# Altium PCB IDC_Tester_v1.PcbDoc (part 3 of 5)
Units mm, origin at the board's own origin, x right, y up, seen from the top; angles counter-clockwise.
Board outline 140 x 140 mm, 2 copper layers (Top Layer, Bottom Layer); 594 components, 528 nets, 1855 pads, 179 vias.
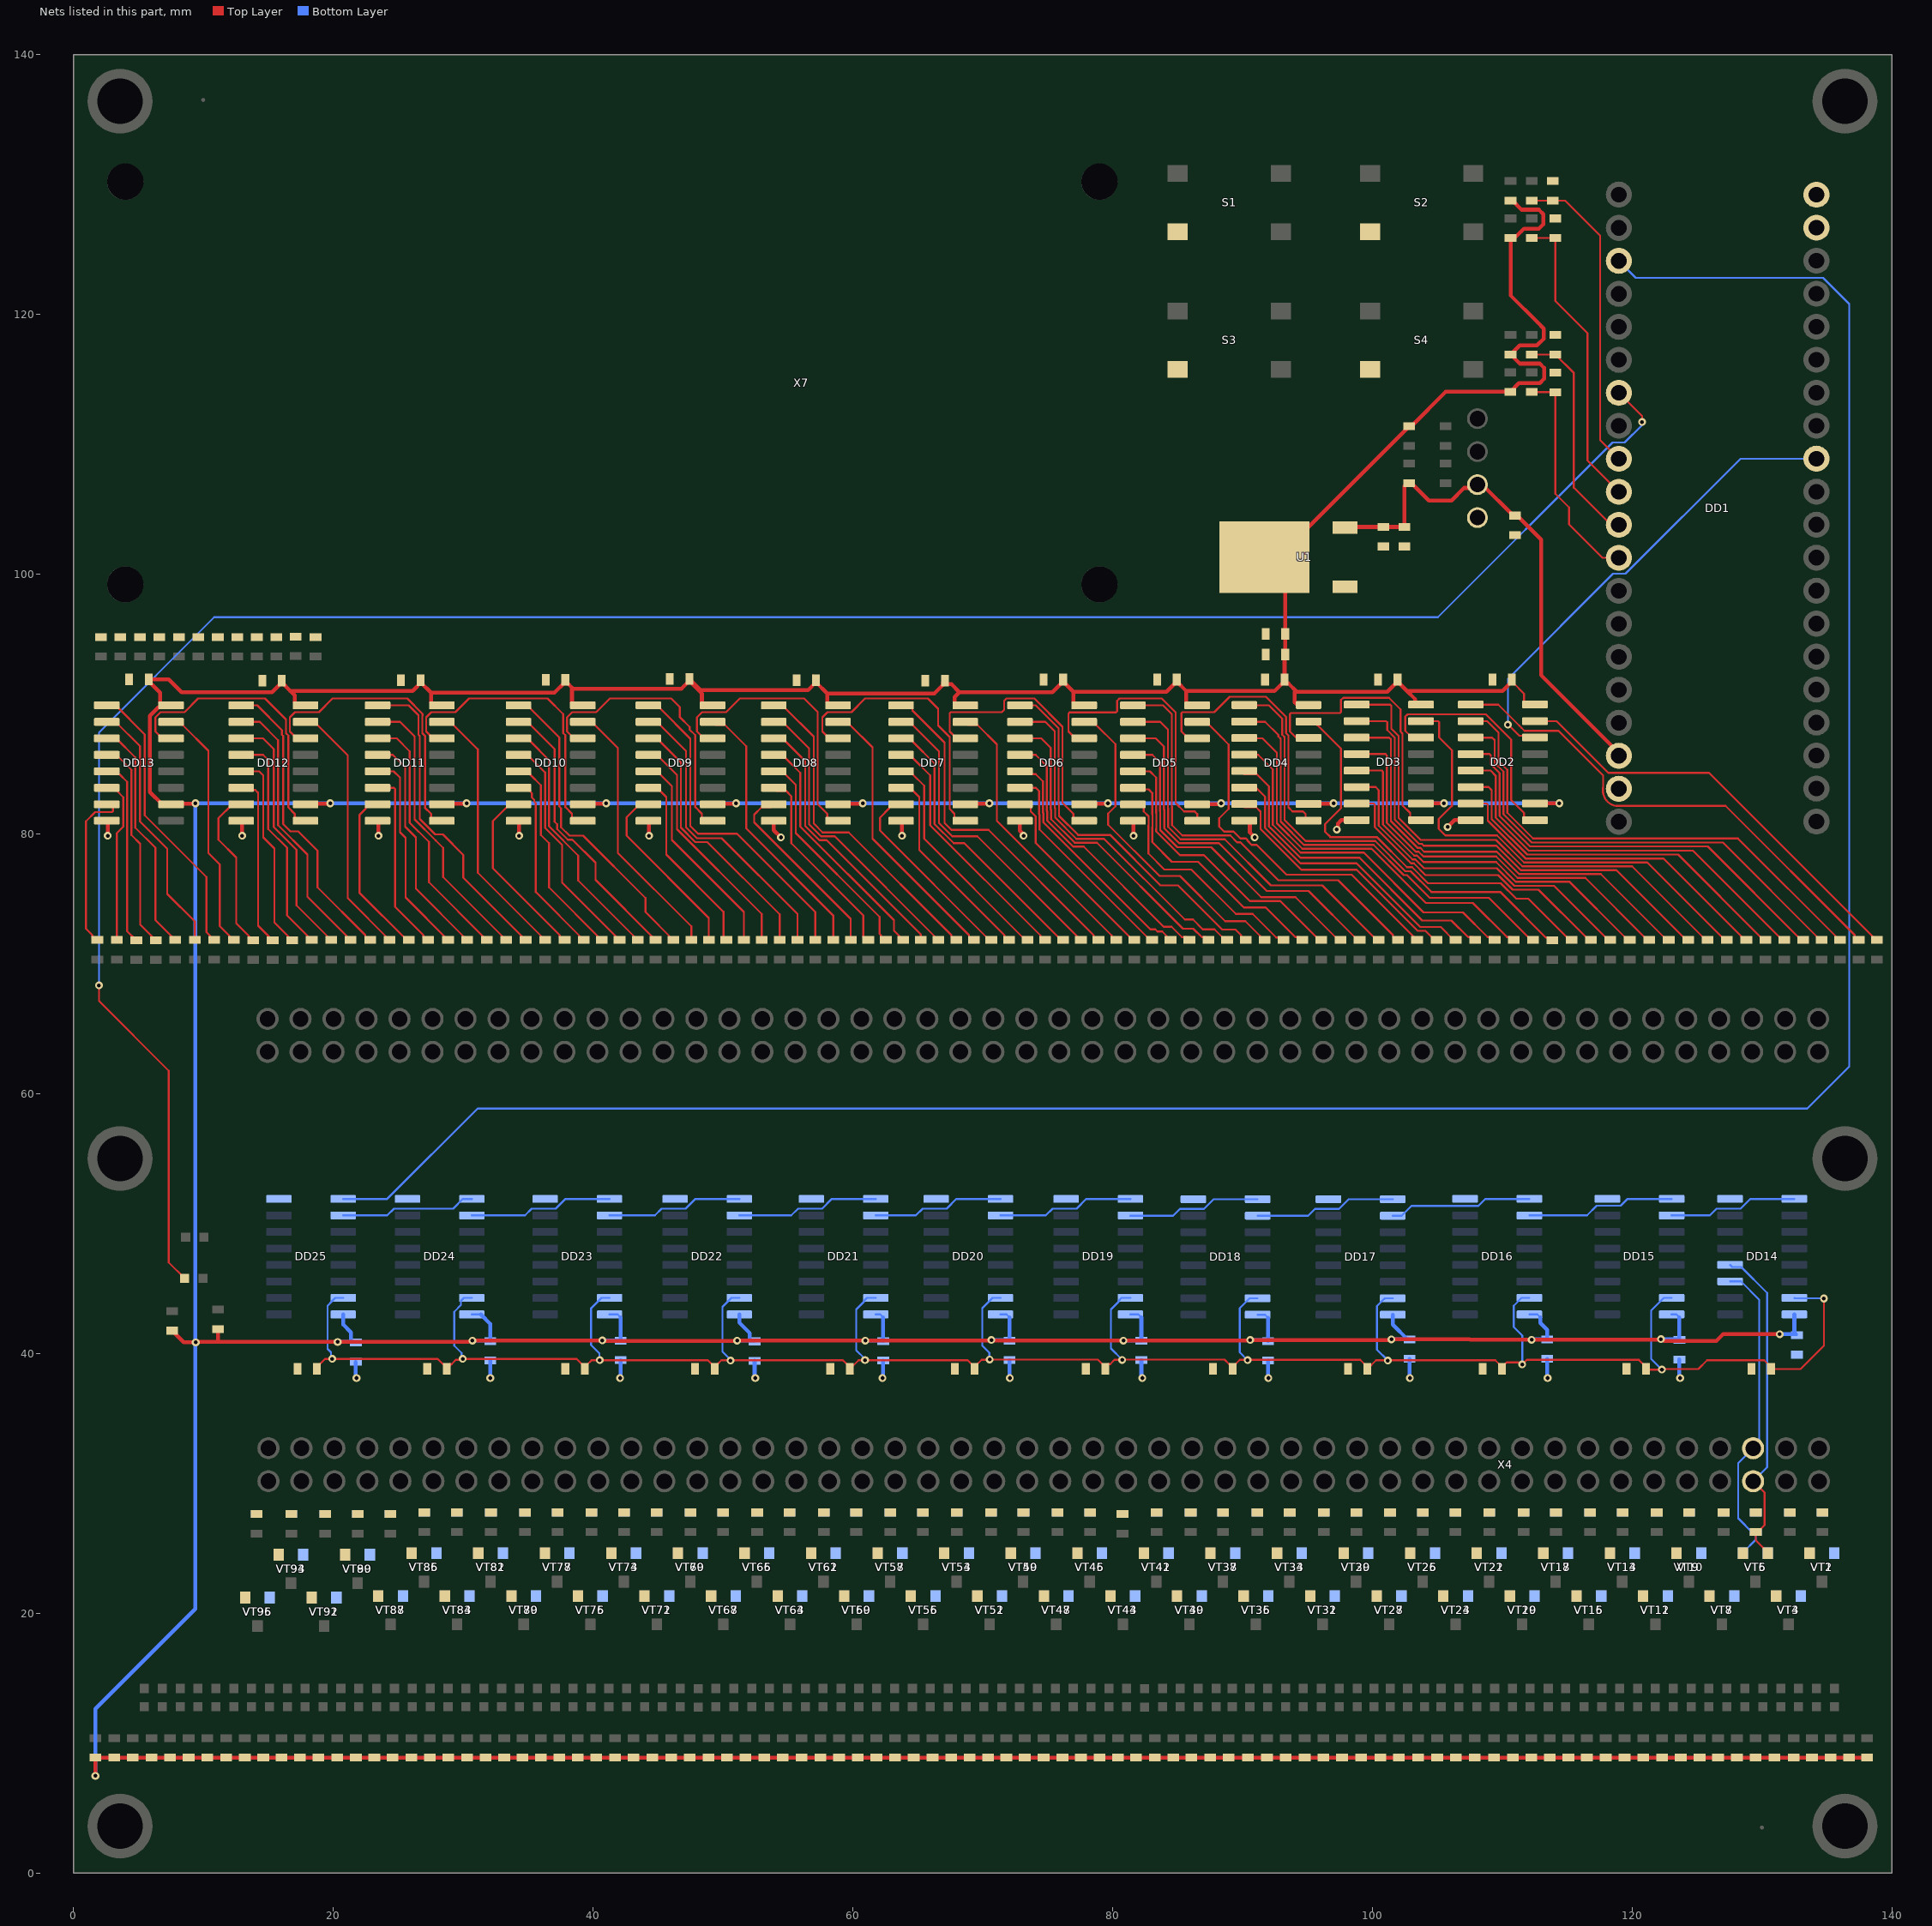
[diagram p2: the nets of this part, all layers, seen from the top]

## Via types
v1: diameter 0.6, hole 0.3, Top Layer to Bottom Layer, 179 vias

## Nets (pads, with @x,y where several pads share a name; then routed paths per layer and width w, separated by ;. In a path a pad name is that pad's centre, name@x,y a point inside that pad or via, vN(x,y) a via of type N, cw(c..) or ccw(c..) an arc to the next point about the centre after c; other vN are vias at no path point)
+3.3V: C1.1 C2.1 C3.1 C4.1 C5.1 C6.1 C7.1 C8.1 C9.1 C10.1 C11.1 C12.1 C15.1 C16.1 C17.1 C18.1 C19.1 C20.1 C21.1 C22.1 C23.1 C24.1 C25.1 C26.1 C30.1 C31.1 DD2.10 DD2.16 DD3.10 DD3.16 DD4.10 DD4.16 DD5.10 DD5.16 DD6.10 DD6.16 DD7.10 DD7.16 DD8.10 DD8.16 DD9.10 DD9.16 DD10.10 DD10.16 DD11.10 DD11.16 DD12.10 DD12.16 DD13.10 DD13.16 DD14.16 DD15.16 DD16.16 DD17.16 DD18.16 DD19.16 DD20.16 DD21.16 DD22.16 DD23.16 DD24.16 DD25.16 R1.2 R3.2 R5.2 R7.2 R9.2 R11.2 R13.2 R15.2 R17.2 R19.2 R21.2 R23.2 R25.2 R27.2 R29.2 R31.2 R33.2 R35.2 R37.2 R39.2 R41.2 R43.2 R45.2 R47.2 R49.2 R51.2 R53.2 R55.2 R57.2 R59.2 R61.2 R63.2 R65.2 R67.2 R69.2 R71.2 R73.2 R75.2 R77.2 R79.2 R81.2 R83.2 R85.2 R87.2 R89.2 R91.2 R93.2 R95.2 R97.2 R99.2 R101.2 R103.2 R105.2 R107.2 R109.2 R111.2 R113.2 R115.2 R117.2 R119.2 R121.2 R123.2 R125.2 R127.2 R129.2 R131.2 R133.2 R135.2 R137.2 R139.2 R141.2 R143.2 R145.2 R147.2 R149.2 R151.2 R153.2 R155.2 R157.2 R159.2 R161.2 R163.2 R165.2 R167.2 R169.2 R171.2 R173.2 R175.2 R177.2 R179.2 R181.2 R183.2 R185.2 R187.2 R189.2 R191.2 R313.2 R315.2 R317.1 R319.1 R324.2 R325.1 R327.1 U1.4 | length 725.5
  Top Layer w0.15: C10.1@26.5,91.45 26.725,91.675 C10.1@26.725,91.825 ; v1(30.725,40.975) v1@30.738,40.987 ; v1@40.713,40.987 v1(40.725,41) ; C8.1@47.197,92.3 C8.1@47.2,92.3 ; 54.967,40.975 54.992,41 ; C7.1@56.95,92.2 57.175,91.975 C7.1@57.175,91.825 ; 58.652,41 58.677,40.975 ; v1(60.975,40.975) v1@61,41 ; v1@70.65,41 v1(70.675,41.025) ; C5.1@76.2,91.725 C5.1@76.2,91.875 ; v1(80.85,40.975) v1@80.875,41 ; C4.1@84.95,91.725 C4.1@84.95,91.875 ; v1@90.575,41 v1(90.6,41.025) ; U1.4@91.7,101.3 U1.4@93.3,99.7 ; 96.012,41.025 96.062,41.075 ; C2.1@101.95,91.725 C2.1@101.95,91.875 C2.1@101.95,92.025 ; R324.2@102.85,111.375 R324.2@103,111.375 ; 107.488,41.075 107.513,41.05 ; R319.1@110.65,125.875 R319.1@110.68,125.905 ; R317.1@110.65,128.75 R317.1@110.8,128.75 ; C1.1@110.711,91.686 110.789,91.686 111.694,90.781 111.694,90.173 111.919,89.948 DD2.16@112.529,89.948 ; C1.1@110.75,91.725 C1.1@110.75,91.875 C1.1@110.775,91.9
  Top Layer w0.3: v1(1.7,7.475) R191.2@1.7,8.875 R189.2@3.15,8.875 R187.2@4.575,8.875 R185.2@6.025,8.875 R183.2@7.45,8.875 R181.2@8.875,8.875 R179.2@10.325,8.875 R177.2@11.775,8.875 R175.2@13.2,8.875 R173.2@14.625,8.875 R171.2@16.025,8.875 R169.2@17.45,8.875 R167.2@18.875,8.875 R165.2@20.325,8.875 R163.2@21.75,8.875 R161.2@23.175,8.875 R159.2@24.575,8.875 R157.2@26.025,8.875 R155.2@27.45,8.875 R153.2@28.875,8.875 R151.2@30.325,8.875 R149.2@31.75,8.875 R147.2@33.175,8.875 R145.2@34.575,8.875 R143.2@36,8.875 R141.2@37.425,8.875 R139.2@38.825,8.875 R137.2@40.25,8.875 R135.2@41.7,8.875 R133.2@43.125,8.875 R131.2@44.575,8.875 R129.2@46.025,8.875 R127.2@47.45,8.875 R125.2@48.9,8.875 R121.2@51.75,8.875 R119.2@53.2,8.875 R117.2@54.625,8.875 R115.2@56.075,8.875 R113.2@57.525,8.875 R111.2@58.95,8.875 R109.2@60.4,8.875 R107.2@61.825,8.875 R105.2@63.25,8.875 R103.2@64.7,8.875 R101.2@66.15,8.875 R99.2@67.575,8.875 R97.2@69,8.875 R95.2@70.425,8.875 R93.2@71.825,8.875 R91.2@73.25,8.875 R89.2@74.7,8.875 R87.2@76.15,8.875 R85.2@77.575,8.875 R83.2@79,8.875 R81.2@80.425,8.875 R79.2@81.825,8.875 R77.2@83.275,8.875 R75.2@84.675,8.875 R73.2@86.075,8.875 R71.2@87.525,8.875 R69.2@88.95,8.875 R67.2@90.425,8.875 R65.2@91.9,8.875 R63.2@93.325,8.875 R61.2@94.8,8.875 R59.2@96.25,8.875 R57.2@97.675,8.875 R55.2@99.15,8.875 R53.2@100.625,8.875 R51.2@102.05,8.875 R49.2@103.525,8.875 R47.2@105,8.875 R45.2@106.45,8.875 R43.2@107.9,8.875 R41.2@109.375,8.875 R35.2@113.675,8.875 R33.2@115.1,8.875 R31.2@116.525,8.875 R29.2@117.975,8.875 R25.2@120.663,8.875 ; R313.2@7.6,41.75 8.5,40.85 v1(9.425,40.85) 9.45,40.875 11.15,40.875 ; v1(9.4,82.35) 9.36,82.31 7.565,82.31 DD13.10@7.525,82.27 6.84,82.27 5.9,83.21 5.9,89.085 6.555,89.74 7.375,89.74 DD13.16@7.525,89.89 6.915,89.89 6.69,90.115 6.69,90.86 5.8,91.75 C12.1@5.8,91.9 7.344,91.9 8.344,90.9 15.3,90.9 C11.1@16.05,91.65 ; R315.2@11.15,41.875 11.15,40.875 ; C11.1@16.05,91.8 C11.1@16.05,91.65 ; DD12.10@17.875,82.27 17.915,82.31 19.735,82.31 v1(19.775,82.35) ; DD12.16@17.875,89.89 17.265,89.89 17.04,90.115 17.04,90.66 16.7,91 ; 26.482,91.362 26.12,91 16.7,91 ; C10.1@26.725,91.675 27.54,90.86 ; DD11.10@28.375,82.27 28.415,82.31 30.235,82.31 v1(30.275,82.35) ; DD11.16@28.375,89.89 27.765,89.89 27.54,90.115 27.54,90.86 ; v1(30.725,40.975) 30.668,40.918 30.455,40.918 30.413,40.875 v1(20.35,40.875) 11.15,40.875 ; v1@30.738,40.987 v1@40.713,40.987 ; C9.1@37.875,91.85 C9.1@37.875,91.7 ; DD10.10@39.225,82.27 39.265,82.31 40.985,82.31 v1(41.025,82.35) ; DD10.16@39.225,89.89 38.615,89.89 38.39,90.115 38.39,91.175 ; v1(40.725,41) 40.757,40.968 v1@51.093,40.968 ; C8.1@47.42,91.77 46.825,91.175 38.39,91.175 ; DD9.10@49.225,82.27 49.265,82.31 50.985,82.31 v1(51.025,82.35) ; DD9.16@49.225,89.89 48.615,89.89 48.39,90.115 48.39,90.81 47.425,91.775 C8.1@47.425,91.925 48.275,91.075 56.575,91.075 C7.1@57.175,91.675 ; v1(51.1,40.975) 54.967,40.975 58.677,40.975 v1(60.975,40.975) ; C7.1@57.175,91.825 C7.1@57.175,91.675 ; DD8.10@58.875,82.27 58.915,82.31 60.735,82.31 v1(60.775,82.35) ; DD8.16@58.875,89.89 58.265,89.89 58.04,90.115 58.04,90.81 ; v1@61,41 v1@70.65,41 ; DD7.10@68.675,82.27 68.715,82.31 70.485,82.31 v1(70.525,82.35) ; DD7.16@68.675,89.89 67.99,89.89 67.84,90.04 67.84,90.535 68.215,90.91 ; v1(70.675,41.025) 70.725,40.975 v1(80.85,40.975) ; DD6.10@77.825,82.27 77.865,82.31 79.61,82.31 v1(79.65,82.35) ; DD6.16@77.825,89.89 77.215,89.89 76.99,90.115 76.99,90.935 ; v1@80.875,41 v1@90.575,41 ; DD5.10@86.525,82.27 86.565,82.31 86.6,82.275 88.35,82.275 88.395,82.32 v1(88.365,82.35) ; DD5.16@86.525,89.89 85.915,89.89 85.69,90.115 85.69,90.985 ; v1(90.6,41.025) 96.012,41.025 101.425,41.025 v1(101.475,41.075) 107.488,41.075 ; U1.4@91.7,101.3 92.775,101.3 R324.2@102.85,111.375 ; C3.1@93.245,91.742 92.487,90.985 85.69,90.985 ; U1.4@93.3,99.7 C30.1@93.3,95.4 C31.1@93.3,93.8 93.25,93.75 C3.1@93.25,91.875 93.25,91.725 93.4,91.575 93.55,91.575 94.19,90.935 ; DD4.16@94.875,89.89 94.265,89.89 94.04,90.115 94.04,90.935 94.19,90.935 ; DD4.10@94.915,82.31 97.019,82.31 v1(97.019,82.35) ; R324.2@103,111.375 105.65,114.025 R327.1@110.625,114.025 111.3,114.7 112.9,114.7 113.225,115.025 113.225,115.875 112.9,116.2 111.35,116.2 R325.1@110.65,116.9 111.35,117.6 112.687,117.6 113.2,118.113 113.2,118.9 112.7,119.4 110.65,121.45 R319.1@110.65,125.875 ; DD3.10@103.754,82.328 103.765,82.339 105.514,82.339 v1(105.525,82.35) ; DD3.16@103.754,89.948 103.515,89.948 103.29,90.173 103.29,90.385 102.675,91 ; 107.513,41.05 v1(112.275,41.05) 122.175,41.05 v1(122.225,41.1) 122.306,41.1 122.456,40.95 126.493,40.95 127.018,41.475 v1(131.375,41.475) ; R319.1@110.68,125.905 111.005,125.905 111.475,126.375 111.675,126.575 112.825,126.575 113.175,126.925 113.175,127.7 112.825,128.05 111.5,128.05 R317.1@110.8,128.75 ; C1.1@110.711,91.686 110.025,91 102.675,91 ; DD2.10@112.529,82.328 112.54,82.339 114.389,82.339 v1(114.4,82.35) ; R25.2@120.875,8.875 R23.2@122.325,8.875 R21.2@123.75,8.875 R19.2@125.2,8.875 R17.2@126.625,8.875 R15.2@128.075,8.875 R13.2@129.5,8.875 R11.2@130.975,8.875 R9.2@132.45,8.875 R7.2@133.85,8.875 R1.2@138.1,8.875 ; C11.1@16.05,91.65 16.7,91 ; 27.54,90.86 37.035,90.86 C9.1@37.875,91.7 ; C9.1@37.875,91.7 38.025,91.55 38.09,91.55 38.39,91.25 38.39,91.175 ; C7.1@57.175,91.675 58.04,90.81 ; 58.04,90.81 66.285,90.81 66.95,91.475 66.95,91.65 C6.1@67.1,91.8 67.1,91.669 67.25,91.519 67.606,91.519 68.215,90.91 ; 68.215,90.91 75.385,90.91 76.2,91.725 76.99,90.935 ; 76.99,90.935 84.16,90.935 84.95,91.725 85.69,90.985 ; 94.19,90.935 101.16,90.935 101.95,91.725 102.475,91.2 102.675,91
  Bottom Layer w0.15: C26.1@21.375,41.075 C26.1@21.575,40.875 ; DD24.16@30.679,43 DD24.16@31.364,43 ; C25.1@31.925,40.975 31.95,40.95 C25.1@32.1,40.95 ; DD23.16@41.279,43 41.9,43 DD23.16@42.125,42.775 ; C24.1@41.95,41 C24.1@41.975,40.975 ; C24.1@42.023,40.975 C24.1@41.975,40.975 ; C24.1@42.125,40.975 C24.1@41.975,40.975 ; C23.1@52.075,41.15 52.25,40.975 52.3,40.925 C23.1@52.45,40.925 ; DD21.16@61.779,43 62.125,43 DD21.16@62.35,42.775 ; C22.1@62.325,40.975 C22.1@62.35,40.95 ; DD20.16@71.379,43 71.85,43 DD20.16@72.075,42.775 ; C21.1@72.025,41.025 C21.1@72.075,40.975 ; DD19.16@81.379,43 82,43 DD19.16@82.225,42.775 ; DD18.16@91.179,42.977 91.75,42.977 DD18.16@91.975,42.752 ; C19.1@91.9,41.025 C19.1@91.975,40.95 ; C18.1@102.725,41.075 C18.1@102.875,41.075 ; DD16.16@112.1,43 112.71,43 DD16.16@112.935,42.775 ; v1(112.275,41.05) v1@112.3,41.075 ; DD15.16@123.05,43 123.425,43 DD15.16@123.65,42.775 ; C16.1@123.575,41.1 C16.1@123.65,41.025 ; C15.1@132.5,41.6 132.625,41.475 C15.1@132.7,41.4 ; C26.1@21.575,40.875 21.725,40.875 C26.1@21.75,40.85 21.6,40.85 C26.1@21.575,40.875
  Bottom Layer w0.3: v1(1.7,7.475) 1.7,12.625 9.4,20.325 v1(9.4,82.35) v1(19.775,82.35) v1(30.275,82.35) v1(41.025,82.35) v1(51.025,82.35) v1(60.775,82.35) v1(70.525,82.35) v1(79.65,82.35) v1(88.365,82.35) 97.35,82.35 v1(114.4,82.35) ; v1(20.35,40.875) C26.1@21.575,40.875 ; DD25.16@20.779,43 20.779,42.223 21.375,41.627 C26.1@21.375,41.075 ; v1(30.725,40.975) C25.1@31.925,40.975 ; DD24.16@31.364,43 32.1,42.264 C25.1@32.1,40.95 ; v1(40.725,41) C24.1@41.95,41 ; C24.1@42.125,40.975 DD23.16@42.125,42.775 ; v1(51.1,40.975) C23.1@52.25,40.975 ; DD22.16@51.279,43 51.279,42.361 52.075,41.565 C23.1@52.075,41.15 ; v1(60.975,40.975) C22.1@62.325,40.975 ; C22.1@62.35,40.95 DD21.16@62.35,42.775 ; v1(70.675,41.025) C21.1@72.025,41.025 ; C21.1@72.075,40.975 DD20.16@72.075,42.775 ; v1(80.85,40.975) C20.1@82.225,40.975 DD19.16@82.225,42.775 ; v1(90.6,41.025) C19.1@91.9,41.025 ; C19.1@91.975,40.95 DD18.16@91.975,42.752 ; v1(101.475,41.075) 102.725,41.075 101.579,42.221 DD17.16@101.579,42.977 ; v1@112.3,41.075 C17.1@113.475,41.075 113.475,41.805 112.935,42.345 DD16.16@112.935,42.775 ; v1(122.225,41.1) C16.1@123.575,41.1 ; C16.1@123.65,41.025 DD15.16@123.65,42.775 ; v1(131.375,41.475) C15.1@132.625,41.475 ; C15.1@132.5,41.6 DD14.16@132.5,43
+5V: C27.1 C28.1 C29.1 DD1.18 R323.2 U1.3 X7.2 | length 40.3
  Top Layer w0.15: U1.3@97.9,103.58 U1.3@97.945,103.625 ; R323.2@102.475,106.775 102.7,107 R323.2@102.85,107 R323.2@103,107 ; X7.2@107.846,106.627 X7.2@108.102,106.883 X7.2@108.467,106.883 ; C27.1@110.85,104.5 C27.1@111,104.5 C27.1@111.15,104.5 ; 113,92.213 113.075,92.138 ; DD1.18@118.985,86.009 DD1.18@118.985,86.228
  Top Layer w0.3: U1.3@97.945,103.625 C29.1@100.85,103.625 C28.1@102.475,103.625 R323.2@102.475,106.775 ; R323.2@103,107 104.35,105.65 106.1,105.65 107.077,106.627 X7.2@107.846,106.627 ; X7.2@108.467,106.883 C27.1@110.85,104.5 ; C27.1@111.15,104.5 113,102.65 113,92.213 ; 113.075,92.138 DD1.18@118.985,86.228
"Button 1": C13.1 DD1.9 R318.2 | length 24.2
  Top Layer w0.15: R318.2@112.275,128.75 C13.1@113.9,128.75 114.85,128.75 117.55,126.05 117.55,110.305 DD1.9@118.985,108.869
"Button 2": C14.1 DD1.10 R320.2 | length 23.4
  Top Layer w0.15: R320.2@112.275,125.875 C14.1@114.1,125.875 114.1,121.025 116.575,118.55 116.575,108.74 DD1.10@118.985,106.329
"Button 3": C32.1 DD1.11 R326.2 | length 17.3
  Top Layer w0.15: R326.2@112.275,116.9 C32.1@114.1,116.9 115.525,115.475 115.525,106.65 118.386,103.789 DD1.11@118.985,103.789
"Button 4": C33.1 DD1.12 R328.2 | length 17.3
  Top Layer w0.15: R328.2@112.275,114.025 112.3,114 C33.1@114.1,114 114.1,106.175 115.15,105.125 115.15,103.825 117.726,101.249 DD1.12@118.985,101.249
CLK_INH: DD14.15 DD15.15 DD16.15 DD17.15 DD18.15 DD19.15 DD20.15 DD21.15 DD22.15 DD23.15 DD24.15 DD25.15 R193.1 R194.1 R195.1 R196.1 R197.1 R198.1 R199.1 R200.1 R201.1 R202.1 R203.1 R204.1 | length 199.5
  Top Layer w0.15: R204.1@18.75,38.8 18.75,38.95 19.375,39.575 28.058,39.575 28.458,39.175 28.525,39.175 R203.1@28.75,38.95 ; R201.1@49.537,38.963 R201.1@49.375,38.8 R201.1@49.375,38.95 ; v1@50.588,39.475 59.25,39.475 R200.1@59.77,38.955 ; v1(50.6,39.45) 50.588,39.462 49.887,39.462 49.55,39.125 49.55,38.95 R201.1@49.375,38.95 ; R200.1@60,38.45 59.775,38.675 R200.1@59.775,38.8 ; R197.1@89.25,38.8 R197.1@89.25,38.95 ; R195.1@110,38.8 R195.1@110,38.95 ; R194.1@121.275,38.8 R194.1@121.075,38.8 R194.1@121.075,38.95 ; v1(122.3,38.75) 121.275,38.75 R194.1@121.075,38.95 ; v1@122.3,38.8 125.109,38.8 125.784,39.475 130.175,39.475 R193.1@130.695,38.955 ; R193.1@130.705,38.955 130.7,38.955 R193.1@130.7,38.8 132.975,38.8 134.775,40.6 v1(134.775,44.225) ; R203.1@28.75,38.95 R203.1@28.9,38.95 ; R203.1@28.75,38.95 R203.1@28.75,38.8 R203.1@28.9,38.95 ; R203.1@28.9,38.95 28.9,39.1 28.975,39.175 29.125,39.175 ; R203.1@28.9,38.95 29.125,39.175 ; 29.125,39.175 29.45,39.5 29.9,39.5 v1(29.975,39.575) 38.75,39.575 R202.1@39.375,38.95 ; R202.1@39.375,38.95 R202.1@39.525,38.95 ; R202.1@39.375,38.95 R202.1@39.375,38.8 R202.1@39.525,38.95 ; R202.1@39.525,38.95 39.525,39.1 39.9,39.475 v1(40.525,39.475) 48.85,39.475 R201.1@49.375,38.95 ; R200.1@59.775,38.8 R200.1@59.925,38.95 ; R200.1@59.775,38.8 59.775,38.95 R200.1@59.925,38.95 ; R200.1@59.925,38.95 60.45,39.475 v1(60.95,39.475) 68.85,39.475 R199.1@69.375,38.95 ; R199.1@69.375,38.95 R199.1@69.525,38.95 ; R199.1@69.375,38.95 R199.1@69.375,38.8 R199.1@69.525,38.95 ; R199.1@69.525,38.95 69.525,39.1 69.935,39.51 70.492,39.51 70.508,39.525 78.875,39.525 R198.1@79.45,38.95 ; R198.1@79.45,38.95 R198.1@79.6,38.95 ; R198.1@79.45,38.95 R198.1@79.45,38.8 R198.1@79.6,38.95 ; R198.1@79.6,38.95 79.6,39.1 79.675,39.175 79.825,39.175 80.15,39.5 v1(80.75,39.5) 80.775,39.525 88.623,39.525 88.973,39.175 89.025,39.175 R197.1@89.25,38.95 ; R197.1@89.25,38.95 89.8,39.5 90.375,39.5 v1(90.4,39.475) 90.425,39.5 99.075,39.5 99.625,38.95 R196.1@99.625,38.8 100.3,39.475 101.175,39.475 v1(101.2,39.45) 101.225,39.475 109.475,39.475 R195.1@110,38.95 ; R195.1@110,38.95 110.35,39.3 111.278,39.3 111.428,39.15 v1(111.55,39.15) 111.9,39.5 120.525,39.5 R194.1@121.075,38.95
  Bottom Layer w0.15: v1(19.925,39.575) 19.839,39.661 19.839,40.083 19.569,40.353 19.569,43.67 19.944,44.045 20.169,44.27 DD25.15@20.779,44.27 ; v1(29.975,39.575) 29.889,39.661 29.889,40.033 29.325,40.597 29.325,43.205 29.844,43.724 29.844,44.045 30.069,44.27 DD24.15@30.679,44.27 ; v1(40.525,39.475) 40.505,39.495 40.505,40 39.85,40.655 39.85,43.451 40.444,44.045 40.669,44.27 DD23.15@41.279,44.27 ; v1(50.6,39.45) 50.6,39.503 49.975,40.128 49.975,43.576 50.444,44.045 50.669,44.27 DD22.15@51.279,44.27 ; v1(60.95,39.475) 60.95,39.562 60.275,40.237 60.275,43.376 60.869,43.97 60.869,44.045 61.094,44.27 DD21.15@61.779,44.27 ; v1(70.55,39.525) 70.522,39.553 70.522,40.05 69.975,40.597 69.975,43.476 70.544,44.045 70.769,44.27 DD20.15@71.379,44.27 ; v1(80.75,39.5) 79.875,40.375 79.875,43.376 80.469,43.97 80.469,44.045 80.694,44.27 DD19.15@81.379,44.27 ; v1(90.4,39.475) 89.8,40.075 89.8,43.157 89.8,43.478 90.344,44.022 90.569,44.247 DD18.15@91.179,44.247 ; v1(101.2,39.45) 100.369,40.281 100.369,43.647 100.744,44.022 100.969,44.247 DD17.15@101.579,44.247 ; v1(111.55,39.15) 111.55,41.375 110.89,42.035 110.89,43.628 110.89,43.67 111.49,44.27 DD16.15@112.1,44.27 ; v1(122.3,38.75) 121.475,39.575 121.475,43.305 121.972,43.802 122.215,44.045 122.44,44.27 DD15.15@123.05,44.27 ; DD14.15@132.5,44.27 132.522,44.248 134.752,44.248 v1(134.775,44.225)
GND: C1.2 C2.2 C3.2 C4.2 C5.2 C6.2 C7.2 C8.2 C9.2 C10.2 C11.2 C12.2 C13.2 C14.2 C15.2 C16.2 C17.2 C18.2 C19.2 C20.2 C21.2 C22.2 C23.2 C24.2 C25.2 C26.2 C27.2 C28.2 C29.2 C30.2 C31.2 C32.2 C33.2 DD1.19 DD1.39 DD1.40 DD2.8 DD3.8 DD4.8 DD5.8 DD6.8 DD7.8 DD8.8 DD9.8 DD10.8 DD11.8 DD12.8 DD13.8 DD14.8 DD15.8 DD16.8 DD17.8 DD18.8 DD19.8 DD20.8 DD21.8 DD22.8 DD23.8 DD24.8 DD25.8 R2.2 R4.2 R6.2 R8.2 R10.2 R12.2 R14.2 R16.2 R18.2 R20.2 R22.2 R24.2 R26.2 R28.2 R30.2 R32.2 R34.2 R36.2 R38.2 R40.2 R42.2 R44.2 R46.2 R48.2 R50.2 R52.2 R54.2 R56.2 R58.2 R60.2 R62.2 R64.2 R66.2 R68.2 R70.2 R72.2 R74.2 R76.2 R78.2 R80.2 R82.2 R84.2 R86.2 R88.2 R90.2 R92.2 R94.2 R96.2 R98.2 R100.2 R102.2 R104.2 R106.2 R108.2 R110.2 R112.2 R114.2 R116.2 R118.2 R120.2 R122.2 R124.2 R126.2 R128.2 R130.2 R132.2 R134.2 R136.2 R138.2 R140.2 R142.2 R144.2 R146.2 R148.2 R150.2 R152.2 R154.2 R156.2 R158.2 R160.2 R162.2 R164.2 R166.2 R168.2 R170.2 R172.2 R174.2 R176.2 R178.2 R180.2 R182.2 R184.2 R186.2 R188.2 R190.2 R192.2 R193.2 R194.2 R195.2 R196.2 R197.2 R198.2 R199.2 R200.2 R201.2 R202.2 R203.2 R204.2 R205.2 R206.2 R207.2 R208.2 R209.2 R210.2 R211.2 R212.2 R213.2 R214.2 R215.2 R216.2 S1.2 S2.2 S3.2 S4.2 U1.1 VT1.2 VT2.2 VT3.2 VT4.2 VT5.2 VT6.2 VT7.2 VT8.2 VT9.2 VT10.2 VT11.2 VT12.2 VT13.2 VT14.2 VT15.2 VT16.2 VT17.2 VT18.2 VT19.2 VT20.2 VT21.2 VT22.2 VT23.2 VT24.2 VT25.2 VT26.2 VT27.2 VT28.2 VT29.2 VT30.2 VT31.2 VT32.2 VT33.2 VT34.2 VT35.2 VT36.2 VT37.2 VT38.2 VT39.2 VT40.2 VT41.2 VT42.2 VT43.2 VT44.2 VT45.2 VT46.2 VT47.2 VT48.2 VT49.2 VT50.2 VT51.2 VT52.2 VT53.2 VT54.2 VT55.2 VT56.2 VT57.2 VT58.2 VT59.2 VT60.2 VT61.2 VT62.2 VT63.2 VT64.2 VT65.2 VT66.2 VT67.2 VT68.2 VT69.2 VT70.2 VT71.2 VT72.2 VT73.2 VT74.2 VT75.2 VT76.2 VT77.2 VT78.2 VT79.2 VT80.2 VT81.2 VT82.2 VT83.2 VT84.2 VT85.2 VT86.2 VT87.2 VT88.2 VT89.2 VT90.2 VT91.2 VT92.2 VT93.2 VT94.2 VT95.2 VT96.2 X7.1 | length 32.3
  Top Layer w0.15: DD13.8@2.575,81 DD13.8@2.65,80.925 ; DD12.8@12.925,81 DD12.8@13,80.925 ; DD11.8@23.425,81 DD11.8@23.5,80.925 ; DD10.8@34.275,81 DD10.8@34.325,80.95 ; DD9.8@44.275,81 DD9.8@44.325,80.95 ; DD7.8@63.725,81 DD7.8@63.8,80.925 ; v1(73.15,79.85) v1@73.15,79.972 ; DD5.8@81.575,81 DD5.8@81.625,80.95 ; DD4.8@89.925,81 90.354,81 DD4.8@90.579,80.775 ; v1(97.275,80.325) v1@97.361,80.411
  Top Layer w0.3: v1(2.65,79.85) DD13.8@2.65,80.925 ; v1(13,79.85) DD12.8@13,80.925 ; v1(23.5,79.85) DD11.8@23.5,80.925 ; v1(34.325,79.85) DD10.8@34.325,80.95 ; v1(44.325,79.85) DD9.8@44.325,80.95 ; DD8.8@53.925,81 53.925,80.275 v1(54.475,79.725) ; v1(63.8,79.85) DD7.8@63.8,80.925 ; DD6.8@72.875,81 72.875,80.247 v1@73.15,79.972 ; v1(81.625,79.85) DD5.8@81.625,80.95 ; DD4.8@90.579,80.775 90.579,80.096 v1(90.95,79.725) ; v1@97.361,80.411 97.361,80.786 97.633,81.058 DD3.8@98.804,81.058 ; v1(105.8,80.525) 106.333,81.058 DD2.8@107.579,81.058
  Bottom Layer w0.3: C26.2@21.75,39.35 21.75,38.15 v1(21.8,38.1) ; v1(32.1,38.1) C25.2@32.1,39.45 ; v1(42.1,38.1) 42.125,38.125 C24.2@42.125,39.475 ; C23.2@52.45,39.425 52.45,38.15 v1(52.5,38.1) ; v1(62.3,38.1) 62.35,38.15 C22.2@62.35,39.45 ; C21.2@72.075,39.475 72.075,38.125 v1(72.1,38.1) ; C20.2@82.225,39.475 82.225,38.175 v1(82.3,38.1) ; C19.2@91.975,39.45 91.975,38.125 v1(92,38.1) ; C18.2@102.875,39.575 102.875,38.125 v1(102.9,38.1) ; C17.2@113.475,39.575 113.475,38.125 v1(113.5,38.1) ; C16.2@123.65,39.525 123.65,38.15 v1(123.7,38.1)
Green: DD1.7 VD97.K | length 176.6
  Top Layer w0.15: v1(1.975,68.325) 1.975,67.125 7.35,61.75 7.35,47 VD97.K@8.575,45.775 ; DD1.7@118.985,113.949 120.775,112.16 v1(120.775,111.7)
  Bottom Layer w0.15: v1(1.975,68.325) 1.975,87.8 10.85,96.675 105.059,96.675 118.509,110.125 119.434,110.125 120.775,111.466 v1(120.775,111.7)
MISO: DD1.3 DD25.9 | length 198
  Bottom Layer w0.15: DD25.9@20.779,51.89 24.17,51.89 31.13,58.85 133.492,58.85 136.725,62.083 136.725,120.787 134.707,122.805 120.29,122.805 DD1.3@118.985,124.109
"MISO 1": DD14.9 DD15.10 | length 10
  Bottom Layer w0.15: DD15.10@123.05,50.62 125.991,50.62 126.516,51.145 128.364,51.145 129.109,51.89 DD14.9@132.5,51.89
"MISO 2": DD15.9 DD16.10 | length 11.5
  Bottom Layer w0.15: DD16.10@112.1,50.62 116.541,50.62 117.286,51.365 119.134,51.365 119.659,51.89 DD15.9@123.05,51.89
"MISO 3": DD16.9 DD17.10 | length 11.1
  Bottom Layer w0.15: DD17.10@101.579,50.597 102.264,50.597 103.023,51.356 108.175,51.356 108.709,51.89 DD16.9@112.1,51.89
"MISO 4": DD17.9 DD18.10 | length 10.9
  Bottom Layer w0.15: DD18.10@91.179,50.597 95.07,50.597 95.595,51.122 97.443,51.122 98.188,51.867 DD17.9@101.579,51.867
"MISO 5": DD18.9 DD19.10 | length 10.3
  Bottom Layer w0.15: DD19.10@81.379,50.597 84.67,50.597 85.195,51.122 87.043,51.122 87.788,51.867 DD18.9@91.179,51.867
"MISO 6": DD19.9 DD20.10 | length 10.5
  Bottom Layer w0.15: DD20.10@71.379,50.62 74.87,50.62 75.395,51.145 77.243,51.145 77.988,51.89 DD19.9@81.379,51.89
"MISO 7": DD20.9 DD21.10 | length 10.1
  Bottom Layer w0.15: DD21.10@61.779,50.62 64.87,50.62 65.395,51.145 67.243,51.145 67.988,51.89 DD20.9@71.379,51.89
"MISO 8": DD21.9 DD22.10 | length 11
  Bottom Layer w0.15: DD22.10@51.279,50.62 55.27,50.62 55.795,51.145 57.643,51.145 58.388,51.89 DD21.9@61.779,51.89
"MISO 9": DD22.9 DD23.10 | length 10.5
  Bottom Layer w0.15: DD23.10@41.279,50.62 44.77,50.62 45.295,51.145 47.143,51.145 47.888,51.89 DD22.9@51.279,51.89
"MISO 10": DD23.9 DD24.10 | length 11.1
  Bottom Layer w0.15: DD24.10@30.679,50.62 34.77,50.62 35.295,51.145 37.143,51.145 37.888,51.89 DD23.9@41.279,51.89
"MISO 11": DD24.9 DD25.10 | length 10.4
  Bottom Layer w0.15: DD25.10@20.779,50.62 24.17,50.62 24.695,51.145 29.249,51.145 29.994,51.89 DD24.9@30.679,51.89
"MOSI 1": DD1.32 DD2.14 | length 36.8
  Top Layer w0.15: v1(110.443,88.393) 110.482,88.393 111.319,87.556 112.381,87.556 DD2.14@112.529,87.408
  Bottom Layer w0.15: v1(110.443,88.393) 110.443,91.929 118.538,100.024 119.493,100.024 128.349,108.88 DD1.32@134.2,108.88
"MOSI 2": DD2.9 DD3.14 | length 18.9
  Top Layer w0.15: DD3.14@103.754,87.408 103.069,87.408 102.544,87.933 102.544,89.027 102.72,89.203 108.746,89.203 110.7,87.249 110.7,82.598 111.694,81.604 111.694,81.283 111.919,81.058 DD2.9@112.529,81.058
"MOSI 3": DD3.9 DD4.14 | length 22.3
  Top Layer w0.15: DD4.14@94.875,87.35 94.19,87.35 93.665,87.875 93.665,89.212 93.753,89.3 97.506,89.3 97.594,89.388 97.594,90.297 97.77,90.473 101.286,90.473 102.178,89.582 102.178,87.875 102.332,87.721 102.332,82.191 102.919,81.604 102.919,81.283 103.144,81.058 DD3.9@103.754,81.058 DD3.9@103.775,81.079
"MOSI 4": DD4.9 DD5.14 | length 21.1
  Top Layer w0.15: DD5.14@86.525,87.35 85.84,87.35 85.315,87.875 85.315,89.277 85.403,89.365 87.841,89.365 89.026,90.55 91.811,90.55 92.636,89.725 93.365,88.996 93.365,87.751 93.55,87.566 93.55,82.036 93.863,81.723 94.677,81.723 94.875,81.525 DD4.9@94.875,81
"MOSI 5": DD5.9 DD6.14 | length 22
  Top Layer w0.15: DD6.14@77.825,87.35 77.14,87.35 76.615,87.875 76.615,89.256 76.703,89.344 80.277,89.344 80.365,89.432 80.365,90.239 80.541,90.415 83.796,90.415 84.867,89.344 84.867,82.369 85.513,81.723 86.327,81.723 86.525,81.525 DD5.9@86.525,81
"MOSI 6": DD6.9 DD7.14 | length 21.6
  Top Layer w0.15: DD7.14@68.675,87.35 67.99,87.35 67.465,87.875 67.465,89.277 67.553,89.365 71.489,89.365 71.665,89.541 71.665,90.239 71.841,90.415 73.984,90.415 76.152,88.247 76.152,82.384 76.99,81.546 76.99,81.225 77.215,81 DD6.9@77.825,81
"MOSI 7": DD7.9 DD8.14 | length 22.2
  Top Layer w0.15: DD8.14@58.875,87.35 58.19,87.35 57.665,87.875 57.665,88.969 58.061,89.365 59.909,89.365 60.959,90.415 65.784,90.415 66.575,89.624 66.575,88.341 67.465,87.451 67.465,81.921 67.84,81.546 67.84,81.225 68.065,81 DD7.9@68.675,81
"MOSI 8": DD8.9 DD9.14 | length 22.2
  Top Layer w0.15: DD9.14@49.225,87.35 48.54,87.35 48.015,87.875 48.015,88.969 48.411,89.365 50.259,89.365 51.309,90.415 56.271,90.415 57.3,89.386 57.3,82.286 58.04,81.546 58.04,81.225 58.265,81 DD8.9@58.875,81
"MOSI 9": DD9.9 DD10.14 | length 22.2
  Top Layer w0.15: DD10.14@39.225,87.35 38.54,87.35 38.015,87.875 38.015,88.969 38.411,89.365 40.259,89.365 41.309,90.415 46.035,90.415 46.7,89.75 46.7,88.975 47.45,88.225 47.45,88.016 47.875,87.591 47.875,82.061 48.39,81.546 48.39,81.225 48.615,81 DD9.9@49.225,81
"MOSI 10": DD10.9 DD11.14 | length 23.4
  Top Layer w0.15: DD11.14@28.375,87.35 27.69,87.35 27.165,87.875 27.165,88.969 27.561,89.365 29.409,89.365 30.459,90.415 36.509,90.415 37.715,89.209 37.715,87.751 37.875,87.591 37.875,82.061 38.39,81.546 38.39,81.225 38.615,81 DD10.9@39.225,81
"MOSI 11": DD11.9 DD12.14 | length 23.1
  Top Layer w0.15: DD12.14@17.875,87.35 17.19,87.35 16.665,87.875 16.665,88.969 17.061,89.365 18.909,89.365 19.959,90.415 25.709,90.415 26.886,89.239 26.886,89.114 26.865,89.094 26.865,87.751 27.075,87.541 27.075,82.011 27.54,81.546 27.54,81.225 27.765,81 DD11.9@28.375,81
"MOSI 12": DD12.9 DD13.14 | length 22.6
  Top Layer w0.15: DD13.14@7.525,87.35 6.84,87.35 6.315,87.875 6.315,88.969 6.711,89.365 8.559,89.365 9.609,90.415 14.76,90.415 16.365,88.81 16.365,87.751 16.55,87.566 16.55,82.036 17.04,81.546 17.04,81.225 17.265,81 DD12.9@17.875,81
NetDD2_1: DD2.1 R218.1 | length 38.4
  Top Layer w0.15: DD2.1@107.579,89.948 109.702,89.948 111.319,88.331 111.319,88.329 111.495,88.153 111.497,88.153 111.717,87.933 114.342,87.933 117.774,84.501 117.774,83.66 cw(c117.624,83.66) 117.772,83.64 ccw(c118.985,83.469) 117.761,83.419 cw(c117.612,83.413) 117.761,83.405 ccw(c118.962,83.331) 118.777,82.143 ccw(c118.799,82.291) 118.818,82.143 cw(c118.985,80.929) 119.129,82.146 ccw(c119.145,82.295) 119.17,82.147 ccw(c118.962,83.331) 119.195,82.151 cw(c119.223,82.004) 119.223,82.154 127.196,82.154 137.15,72.2 137.15,72.05 137.375,71.825 R218.1@137.525,71.825
NetDD2_2: DD2.2 R219.1 | length 38.7
  Top Layer w0.15: DD2.2@107.579,88.678 108.847,88.678 109.725,87.8 109.725,85.599 110.4,84.924 110.4,81.628 112.378,79.65 128.15,79.65 135.975,71.825 R219.1@136.125,71.825
NetDD2_3: DD2.3 R220.1 | length 36.5
  Top Layer w0.15: DD2.3@107.579,87.408 109.229,87.408 109.425,87.212 109.425,85.474 110.1,84.799 110.1,81.503 112.278,79.325 127,79.325 134.5,71.825 R220.1@134.65,71.825
NetDD2_4: DD2.4 R221.1 | length 33.9
  Top Layer w0.15: DD2.4@107.579,86.138 109.037,86.138 109.125,86.05 109.125,85.35 109.8,84.675 109.8,81.379 112.154,79.025 125.825,79.025 133.025,71.825 R221.1@133.175,71.825
NetDD2_5: DD2.5 R222.1 | length 31.4
  Top Layer w0.15: DD2.5@107.579,84.868 109.112,84.868 109.5,84.48 109.5,81.255 112.055,78.7 124.7,78.7 131.35,72.05 131.575,71.825 R222.1@131.725,71.825
NetDD2_6: DD2.6 R223.1 | length 28.9
  Top Layer w0.15: DD2.6@107.579,83.598 108.962,83.598 109.2,83.36 109.2,81.131 111.931,78.4 123.55,78.4 130.125,71.825 R223.1@130.275,71.825
NetDD2_7: DD2.7 R224.1 | length 26.3
  Top Layer w0.15: DD2.7@107.579,82.328 108.812,82.328 108.9,82.24 108.9,81.006 111.806,78.1 122.418,78.1 128.425,72.093 128.425,72.05 128.65,71.825 R224.1@128.8,71.825
NetDD2_15: DD2.15 R217.1 | length 33.4
  Top Layer w0.15: DD2.15@112.529,88.678 114.197,88.678 118.181,84.694 125.931,84.694 138.8,71.825 R217.1@138.95,71.825
NetDD3_1: DD3.1 R226.1 | length 39.3
  Top Layer w0.15: DD3.1@98.804,89.948 101.387,89.948 101.475,89.86 101.475,88.086 102.032,87.529 102.032,81.221 103.728,79.525 109.533,79.525 111.558,77.5 120,77.5 125.675,71.825 R226.1@125.825,71.825
NetDD3_2: DD3.2 R227.1 | length 36.6
  Top Layer w0.15: DD3.2@98.804,88.678 101.062,88.678 101.15,88.59 101.15,87.986 101.732,87.404 101.732,81.096 103.603,79.225 103.82,79.225 103.97,79.075 109.559,79.075 111.434,77.2 118.8,77.2 123.95,72.05 124.175,71.825 R227.1@124.325,71.825
NetDD3_3: DD3.3 R228.1 | length 34.2
  Top Layer w0.15: DD3.3@98.804,87.408 101.304,87.408 101.432,87.28 101.432,80.972 103.479,78.925 103.696,78.925 103.996,78.625 109.584,78.625 111.309,76.9 117.6,76.9 122.675,71.825 R228.1@122.825,71.825
NetDD3_4: DD3.4 R229.1 | length 31.5
  Top Layer w0.15: DD3.4@98.804,86.138 101.024,86.138 101.132,86.03 101.132,80.848 103.355,78.625 103.571,78.625 103.946,78.25 109.535,78.25 111.185,76.6 116.4,76.6 121.175,71.825 R229.1@121.325,71.825
NetDD3_5: DD3.5 R230.1 | length 28.8
  Top Layer w0.15: DD3.5@98.804,84.868 100.744,84.868 100.832,84.78 100.832,80.724 103.231,78.325 103.447,78.325 103.947,77.825 109.536,77.825 111.061,76.3 115.2,76.3 119.45,72.05 119.675,71.825 R230.1@119.825,71.825
NetDD3_6: DD3.6 R231.1 | length 26
  Top Layer w0.15: DD3.6@98.804,83.598 100.262,83.598 100.497,83.363 100.497,80.634 103.106,78.025 103.323,78.025 103.998,77.35 109.587,77.35 110.937,76 114,76 118.175,71.825 R231.1@118.325,71.825
NetDD3_7: DD3.7 R232.1 | length 23.4
  Top Layer w0.15: DD3.7@98.804,82.328 100.109,82.328 100.197,82.24 100.197,80.51 102.982,77.725 103.199,77.725 104.099,76.825 109.687,76.825 110.812,75.7 112.8,75.7 116.45,72.05 116.675,71.825 R232.1@116.825,71.825
NetDD3_15: DD3.15 R225.1 | length 36.2
  Top Layer w0.15: DD3.15@103.754,88.678 105.062,88.678 105.15,88.59 105.15,87.413 106.15,86.413 106.15,82.175 106.1,82.125 106.1,82.112 105.125,81.137 105.125,80.387 105.637,79.875 109.607,79.875 111.682,77.8 121.175,77.8 127.15,71.825 R225.1@127.3,71.825
NetDD4_1: DD4.1 R234.1 | length 35.9
  Top Layer w0.15: DD4.1@89.925,89.89 92.047,89.89 93.065,88.872 93.065,87.626 93.25,87.441 93.25,81.911 93.25,81.066 94.866,79.45 100.226,79.45 102.551,77.125 102.95,77.125 104.55,75.525 109.85,75.525 113.35,72.025 113.65,72.025 R234.1@113.875,71.8
NetDD4_2: DD4.2 R235.1 | length 33.2
  Top Layer w0.15: DD4.2@89.925,88.62 91.755,88.62 92.765,87.61 92.765,87.502 92.95,87.317 92.95,81.787 92.95,80.941 94.741,79.15 100.101,79.15 102.426,76.825 102.675,76.825 104.425,75.075 108.975,75.075 112.225,71.825 R235.1@112.375,71.825
NetDD4_3: DD4.3 R236.1 | length 30.6
  Top Layer w0.15: DD4.3@89.925,87.35 91.55,87.35 92.65,86.25 92.65,81.663 92.65,80.817 94.617,78.85 99.951,78.85 104.126,74.675 107.75,74.675 110.375,72.05 110.675,72.05 R236.1@110.9,71.825
NetDD4_4: DD4.4 R237.1 | length 27.9
  Top Layer w0.15: DD4.4@89.925,86.08 91.22,86.08 92.35,84.95 92.35,81.539 92.35,80.693 94.493,78.55 99.35,78.55 103.95,73.95 106.975,73.95 108.878,72.047 109.203,72.047 R237.1@109.425,71.825
NetDD4_5: DD4.5 R238.1 | length 25.2
  Top Layer w0.15: DD4.5@89.925,84.81 90.15,84.585 91.115,84.585 92.05,83.65 92.05,81.414 92.05,80.569 92.175,80.444 94.469,78.15 99.025,78.15 103.85,73.325 106.1,73.325 107.378,72.047 107.703,72.047 R238.1@107.925,71.825
NetDD4_6: DD4.6 R239.1 | length 22.8
  Top Layer w0.15: DD4.6@89.925,83.54 89.988,83.477 91.135,83.477 91.75,82.862 91.75,81.29 91.75,80.444 94.469,77.725 98.8,77.725 103.7,72.825 105.275,72.825 106.275,71.825 R239.1@106.425,71.825
NetDD4_7: DD4.7 R240.1 | length 20.1
  Top Layer w0.15: DD4.7@89.925,82.27 90.15,82.045 91.058,82.045 91.4,81.703 91.4,80.37 94.545,77.225 98.8,77.225 103.5,72.525 104.1,72.525 104.8,71.825 R240.1@104.95,71.825
NetDD4_15: DD4.15 R233.1 | length 32.9
  Top Layer w0.15: DD4.15@94.875,88.62 95.56,88.62 95.785,88.395 95.785,88.365 97.6,86.55 97.6,86.493 97.594,86.487 97.594,85.789 97.6,85.783 97.6,85.223 97.594,85.217 97.594,84.519 97.6,84.513 97.6,83.953 97.594,83.947 97.594,83.249 97.6,83.243 97.6,82.683 97.594,82.677 97.594,81.969 96.375,80.75 96.375,80.15 96.775,79.75 100.35,79.75 102.675,77.425 103.074,77.425 104.299,76.2 109.888,76.2 111.088,75 112.025,75 114.975,72.05 115.2,71.825 R233.1@115.35,71.825
NetDD5_1: DD5.1 R242.1 | length 33
  Top Layer w0.15: DD5.1@81.575,89.89 83.897,89.89 84.567,89.22 84.567,82.113 84.585,82.095 84.585,80.665 85.377,79.873 89.069,79.873 89.594,79.348 89.852,79.348 92.775,76.425 97.375,76.425 101.6,72.2 101.6,72.05 101.825,71.825 R242.1@101.975,71.825
NetDD5_2: DD5.2 R243.1 | length 30.3
  Top Layer w0.15: DD5.2@81.575,88.62 83.68,88.62 84.267,88.033 84.267,81.988 84.285,81.971 84.285,80.541 85.253,79.573 88.652,79.573 92.2,76.025 96.15,76.025 100.35,71.825 R243.1@100.5,71.825
NetDD5_3: DD5.3 R244.1 | length 27.6
  Top Layer w0.15: DD5.3@81.575,87.35 83.337,87.35 83.967,86.72 83.967,81.864 83.985,81.846 83.985,80.416 85.129,79.273 88.202,79.273 91.875,75.6 95.1,75.6 98.875,71.825 R244.1@99.025,71.825
NetDD5_4: DD5.4 R245.1 | length 24.9
  Top Layer w0.15: DD5.4@81.575,86.08 83.07,86.08 83.667,85.483 83.667,81.74 83.685,81.722 83.685,80.292 85.004,78.973 87.602,78.973 91.45,75.125 94.1,75.125 97.4,71.825 R245.1@97.55,71.825
NetDD5_5: DD5.5 R246.1 | length 22.3
  Top Layer w0.15: DD5.5@81.575,84.81 82.89,84.81 83.367,84.333 83.367,81.616 83.385,81.598 83.385,80.402 83.367,80.384 83.367,80.186 85.203,78.35 87.05,78.35 90.575,74.825 92.925,74.825 95.925,71.825 R246.1@96.075,71.825
NetDD5_6: DD5.6 R247.1 | length 20.1
  Top Layer w0.15: DD5.6@81.575,83.54 81.7,83.415 82.785,83.415 83.067,83.133 83.067,81.491 83.085,81.474 83.085,80.526 83.067,80.509 83.067,79.358 84.577,77.848 86.602,77.848 90.123,74.327 91.798,74.327 94.078,72.047 94.403,72.047 R247.1@94.625,71.825
NetDD5_7: DD5.7 R248.1 | length 17.8
  Top Layer w0.15: DD5.7@81.575,82.27 82.185,82.27 82.41,82.045 82.41,81.724 82.785,81.349 82.785,80.651 82.767,80.633 82.767,78.483 84,77.25 86.075,77.25 89.5,73.825 90.793,73.825 92.6,72.018 92.982,72.018 R248.1@93.175,71.825
NetDD5_15: DD5.15 R241.1 | length 28.7
  Top Layer w0.15: DD5.15@86.525,88.62 87.21,88.62 87.435,88.395 87.435,88.39 88.325,87.5 88.95,86.875 88.95,86.459 88.94,86.449 88.94,85.751 88.95,85.741 88.95,85.189 88.94,85.179 88.94,84.481 88.95,84.471 88.95,83.919 88.94,83.909 88.94,83.211 88.95,83.201 88.95,82.649 88.94,82.639 88.94,81.915 88.225,81.2 88.225,80.55 88.602,80.173 89.327,80.173 89.852,79.648 90.287,79.648 90.375,79.56 90.375,79.487 90.712,79.15 91.1,79.15 93.4,76.85 98.425,76.85 R241.1@103.45,71.825
NetDD6_1: DD6.1 R250.1 | length 28.9
  Top Layer w0.15: DD6.1@72.875,89.89 74.085,89.89 75.852,88.123 75.852,82.259 75.885,82.226 75.885,81.381 77.35,79.915 79.81,79.915 83.7,76.025 85.05,76.025 88.45,72.625 89.475,72.625 89.9,72.2 89.9,72.05 90.125,71.825 R250.1@90.275,71.825
NetDD6_2: DD6.2 R251.1 | length 26.8
  Top Layer w0.15: DD6.2@72.875,88.62 74.83,88.62 75.552,87.898 75.552,82.003 75.585,81.971 75.585,81.256 77.226,79.615 79.36,79.615 85.575,73.4 86.2,73.4 86.95,72.65 87.85,72.65 88.675,71.825 R251.1@88.825,71.825
NetDD6_3: DD6.3 R252.1 | length 24.2
  Top Layer w0.15: DD6.3@72.875,87.35 74.525,87.35 75.252,86.623 75.252,81.879 75.285,81.846 75.285,81.132 77.102,79.315 78.81,79.315 85.425,72.7 86.225,72.7 86.875,72.05 87.175,72.05 R252.1@87.4,71.825
NetDD6_4: DD6.4 R253.1 | length 21.4
  Top Layer w0.15: DD6.4@72.875,86.08 72.878,86.077 74.085,86.077 74.952,85.21 74.952,81.755 74.985,81.722 74.985,81.008 76.977,79.015 77.785,79.015 83.95,72.85 84.55,72.85 85.35,72.05 85.7,72.05 R253.1@85.925,71.825
NetDD6_5: DD6.5 R254.1 | length 18.8
  Top Layer w0.15: DD6.5@72.875,84.81 73.083,84.602 74.085,84.602 74.652,84.035 74.652,81.631 74.685,81.598 74.685,80.884 82.919,72.65 83.293,72.65 83.468,72.475 83.825,72.475 R254.1@84.475,71.825
NetDD6_6: DD6.6 R255.1 | length 16.7
  Top Layer w0.15: DD6.6@72.875,83.54 74.11,83.54 74.352,83.298 74.352,81.506 74.385,81.474 74.385,80.34 82.9,71.825 R255.1@83.05,71.825
NetDD6_7: DD6.7 R256.1 | length 14.5
  Top Layer w0.15: DD6.7@72.875,82.27 73.485,82.27 73.71,82.045 73.71,81.724 74.085,81.349 74.085,79.293 81.3,72.078 81.3,72.05 81.525,71.825 R256.1@81.675,71.825
NetDD6_15: DD6.15 R249.1 | length 25.3
  Top Layer w0.15: DD6.15@77.825,88.62 78.51,88.62 78.735,88.395 78.735,88.39 80.225,86.9 80.225,82.112 79.675,81.562 79.675,80.7 83.625,76.75 85.2,76.75 88.675,73.275 90.225,73.275 91.35,72.15 91.35,72.05 91.575,71.825 R249.1@91.725,71.825
NetDD7_1: DD7.1 R258.1 | length 26.5
  Top Layer w0.15: DD7.1@63.725,89.89 64.372,89.89 64.597,89.665 64.597,89.503 67.075,87.025 67.075,80.825 67.6,80.3 70.45,80.3 78.55,72.2 78.55,72.05 78.775,71.825 R258.1@78.925,71.825
NetDD7_2: DD7.2 R259.1 | length 24.1
  Top Layer w0.15: DD7.2@63.725,88.62 64.41,88.62 64.635,88.395 64.635,88.365 66.65,86.35 66.65,80.826 67.676,79.8 69.6,79.8 R259.1@77.575,71.825
NetDD7_3: DD7.3 R260.1 | length 21.7
  Top Layer w0.15: DD7.3@63.725,87.35 64.41,87.35 64.635,87.125 64.635,87.09 66.3,85.425 66.3,80.751 67.776,79.275 68.6,79.275 76.05,71.825 R260.1@76.2,71.825
NetDD7_4: DD7.4 R261.1 | length 19.3
  Top Layer w0.15: DD7.4@63.725,86.08 64.41,86.08 64.635,85.855 64.635,85.84 65.975,84.5 65.975,80.652 74.45,72.177 74.45,72.05 74.675,71.825 R261.1@74.825,71.825
NetDD7_5: DD7.5 R262.1 | length 17.5
  Top Layer w0.15: DD7.5@63.725,84.81 64.41,84.81 64.635,84.585 64.635,84.565 65.5,83.7 65.5,79.625 73.3,71.825 R262.1@73.45,71.825
NetDD7_6: DD7.6 R263.1 | length 15.7
  Top Layer w0.15: DD7.6@63.725,83.54 64.41,83.54 64.635,83.315 65.125,82.825 65.125,78.75 71.675,72.2 71.675,72.05 71.9,71.825 R263.1@72.05,71.825
NetDD7_7: DD7.7 R264.1 | length 15.2
  Top Layer w0.15: DD7.7@63.725,82.27 63.04,82.27 62.815,82.045 62.815,81.965 62.1,81.25 62.1,80.25 70.525,71.825 R264.1@70.675,71.825
NetDD7_15: DD7.15 R257.1 | length 22.1
  Top Layer w0.15: DD7.15@68.675,88.62 68.9,88.395 69.598,88.395 71.1,86.893 71.1,81.004 79.925,72.179 79.925,72.05 80.15,71.825 R257.1@80.3,71.825
NetDD8_1: DD8.1 R266.1 | length 25.5
  Top Layer w0.15: DD8.1@53.925,89.89 54.61,89.89 54.835,89.665 54.835,89.64 57,87.475 57,80.8 57.691,80.109 59.691,80.109 67.6,72.2 67.6,72.05 67.825,71.825 R266.1@67.975,71.825
NetDD8_2: DD8.2 R267.1 | length 23.1
  Top Layer w0.15: DD8.2@53.925,88.62 54.61,88.62 54.835,88.395 54.835,88.39 56.65,86.575 56.65,80.726 57.567,79.809 58.616,79.809 R267.1@66.6,71.825
NetDD8_3: DD8.3 R268.1 | length 20.9
  Top Layer w0.15: DD8.3@53.925,87.35 54.61,87.35 54.835,87.125 54.835,87.115 56.35,85.6 56.35,80.601 57.442,79.509 57.991,79.509 65.238,72.262 65.238,71.837 R268.1@65.25,71.825
NetDD8_4: DD8.4 R269.1 | length 18.8
  Top Layer w0.15: DD8.4@53.925,86.08 54.61,86.08 54.835,85.855 54.835,85.84 55.975,84.7 55.975,80.552 63.175,73.352 63.175,72.55 R269.1@63.9,71.825
NetDD8_5: DD8.5 R270.1 | length 17
  Top Layer w0.15: DD8.5@53.925,84.81 54.61,84.81 54.835,84.585 54.835,84.565 55.625,83.775 55.625,80.05 62.075,73.6 62.075,72.3 62.175,72.2 62.175,72.05 62.4,71.825 R270.1@62.55,71.825
NetDD8_6: DD8.6 R271.1 | length 15.2
  Top Layer w0.15: DD8.6@53.925,83.54 54.15,83.315 54.855,83.315 55.275,82.895 55.275,79.275 60.825,73.725 60.825,72.05 61.05,71.825 R271.1@61.2,71.825
NetDD8_7: DD8.7 R272.1 | length 14.6
  Top Layer w0.15: DD8.7@53.925,82.27 53.7,82.045 52.998,82.045 52.425,81.472 52.425,80.875 59.85,73.45 R272.1@59.85,71.825
NetDD8_15: DD8.15 R265.1 | length 21.6
  Top Layer w0.15: DD8.15@58.875,88.62 59.56,88.62 59.785,88.395 59.785,88.39 61.525,86.65 61.525,79.625 68.95,72.2 68.95,72.05 69.175,71.825 R265.1@69.325,71.825
NetDD9_1: DD9.1 R274.1 | length 25.5
  Top Layer w0.15: DD9.1@44.275,89.89 44.96,89.89 45.185,89.665 45.185,89.64 47.5,87.325 47.5,80.6 48.1,80 51.1,80 57.125,73.975 R274.1@57.125,71.825
NetDD9_2: DD9.2 R275.1 | length 23.1
  Top Layer w0.15: DD9.2@44.275,88.62 44.96,88.62 45.185,88.395 45.185,88.365 47.175,86.375 47.175,80.501 48.01,79.666 49.909,79.666 55.75,73.825 R275.1@55.75,71.825
NetDD9_3: DD9.3 R276.1 | length 20.7
  Top Layer w0.15: DD9.3@44.275,87.35 44.96,87.35 45.185,87.125 45.185,87.09 46.775,85.5 46.775,80.476 47.886,79.366 48.809,79.366 54.375,73.8 R276.1@54.375,71.825
NetDD9_4: DD9.4 R277.1 | length 18.3
  Top Layer w0.15: DD9.4@44.275,86.08 44.96,86.08 45.185,85.855 45.185,85.815 46.475,84.525 46.475,80.352 53,73.827 R277.1@53,71.825
NetDD9_5: DD9.5 R278.1 | length 16.4
  Top Layer w0.15: DD9.5@44.275,84.81 44.96,84.81 45.185,84.585 45.185,84.565 46.075,83.675 46.075,79.525 51.625,73.975 R278.1@51.625,71.825
NetDD9_6: DD9.6 R279.1 | length 14.6
  Top Layer w0.15: DD9.6@44.275,83.54 44.96,83.54 45.185,83.315 45.185,83.29 45.65,82.825 45.65,78.4 50.05,74 50.05,72.05 R279.1@50.275,71.825
NetDD9_7: DD9.7 R280.1 | length 14.2
  Top Layer w0.15: DD9.7@44.275,82.27 43.59,82.27 42.6,81.28 42.6,79.85 48.925,73.525 R280.1@48.925,71.825
NetDD9_15: DD9.15 R273.1 | length 21.1
  Top Layer w0.15: DD9.15@49.225,88.62 49.45,88.395 50.157,88.395 51.805,86.747 51.805,80.42 58.5,73.725 R273.1@58.5,71.825
NetDD10_1: DD10.1 R282.1 | length 24
  Top Layer w0.15: DD10.1@34.275,89.89 34.96,89.89 35.185,89.665 35.185,89.64 37.415,87.41 37.415,82.096 37.55,81.961 37.55,80.5 38.2,79.85 39.25,79.85 44.05,75.05 44.05,73.975 R282.1@46.2,71.825
NetDD10_2: DD10.2 R283.1 | length 21.8
  Top Layer w0.15: DD10.2@34.275,88.62 34.96,88.62 35.185,88.395 35.185,88.39 37.05,86.525 37.05,80.925 37.25,80.725 37.25,80.376 38.076,79.55 38.425,79.55 40.2,77.775 40.2,76.45 R283.1@44.825,71.825
NetDD10_3: DD10.3 R284.1 | length 19.7
  Top Layer w0.15: DD10.3@34.275,87.35 34.96,87.35 35.185,87.125 35.185,87.115 36.625,85.675 36.625,80.576 38.875,78.326 38.875,76.4 R284.1@43.45,71.825
NetDD10_4: DD10.4 R285.1 | length 17.9
  Top Layer w0.15: DD10.4@34.275,86.08 34.5,85.855 35.188,85.855 36.325,84.718 36.325,80.452 37.625,79.152 37.625,76.25 R285.1@42.05,71.825
NetDD10_5: DD10.5 R286.1 | length 16
  Top Layer w0.15: DD10.5@34.275,84.81 34.96,84.81 35.185,84.585 35.185,84.55 36,83.735 36,79.9 36.625,79.275 36.625,75.875 R286.1@40.675,71.825
NetDD10_6: DD10.6 R287.1 | length 14.2
  Top Layer w0.15: DD10.6@34.275,83.54 34.96,83.54 35.185,83.315 35.185,83.237 35.302,83.12 35.302,82.802 35.485,82.619 35.485,82.485 35.6,82.37 35.6,75.525 R287.1@39.3,71.825
NetDD10_7: DD10.7 R288.1 | length 14
  Top Layer w0.15: DD10.7@34.275,82.27 33.59,82.27 32.3,80.98 32.3,77.35 37.45,72.2 37.45,72.05 37.675,71.825 R288.1@37.825,71.825
NetDD10_15: DD10.15 R281.1 | length 20.7
  Top Layer w0.15: DD10.15@39.225,88.62 39.91,88.62 41.925,86.605 41.925,78.525 47.575,72.875 R281.1@47.575,71.825
NetDD11_1: DD11.1 R290.1 | length 24.5
  Top Layer w0.15: DD11.1@23.425,89.89 25.81,89.89 26.565,89.135 26.565,87.626 26.675,87.516 26.675,81.141 27.866,79.95 28.45,79.95 30.025,78.375 30.025,76.625 R290.1@34.825,71.825
NetDD11_2: DD11.2 R291.1 | length 21.9
  Top Layer w0.15: DD11.2@23.425,88.62 25.158,88.62 26.265,87.513 26.265,87.502 26.275,87.492 26.275,81.116 27.916,79.475 28.475,78.916 28.475,76.675 R291.1@33.325,71.825
NetDD11_3: DD11.3 R292.1 | length 19.9
  Top Layer w0.15: DD11.3@23.425,87.35 24.9,87.35 25.9,86.35 25.9,80.85 27.375,79.375 27.375,76.275 R292.1@31.825,71.825
NetDD11_4: DD11.4 R293.1 | length 17.8
  Top Layer w0.15: DD11.4@23.425,86.08 24.595,86.08 25.55,85.125 25.55,80.55 26.375,79.725 26.375,75.775 R293.1@30.325,71.825
NetDD11_5: DD11.5 R294.1 | length 16
  Top Layer w0.15: DD11.5@23.425,84.81 24.665,84.81 25.15,84.325 25.15,80.125 25.575,79.7 25.575,75.1 R294.1@28.85,71.825
NetDD11_6: DD11.6 R295.1 | length 14.2
  Top Layer w0.15: DD11.6@23.425,83.54 24.687,83.54 24.775,83.452 24.775,74.375 26.95,72.2 26.95,72.05 27.175,71.825 R295.1@27.325,71.825
NetDD11_7: DD11.7 R296.1 | length 13.1
  Top Layer w0.15: DD11.7@23.425,82.27 22.74,82.27 22.515,82.045 22.515,81.94 22.025,81.45 22.025,75.475 25.675,71.825 R296.1@25.825,71.825
NetDD11_15: DD11.15 R289.1 | length 20.5
  Top Layer w0.15: DD11.15@28.375,88.62 29.06,88.62 29.285,88.395 29.285,88.365 31.15,86.5 31.15,77 R289.1@36.325,71.825
NetDD12_1: DD12.1 R298.1 | length 23.3
  Top Layer w0.15: DD12.1@12.925,89.89 14.16,89.89 16.065,87.985 16.065,87.626 16.15,87.541 16.15,80.75 16.717,80.183 17.317,80.183 18.8,78.7 18.8,75.875 22.475,72.2 22.475,72.05 22.7,71.825 R298.1@22.85,71.825
NetDD12_2: DD12.2 R299.1 | length 21.1
  Top Layer w0.15: DD12.2@12.925,88.62 14.355,88.62 15.765,87.21 15.765,80.66 18.025,78.4 18.025,75.15 R299.1@21.35,71.825
NetDD12_3: DD12.3 R300.1 | length 19.4
  Top Layer w0.15: DD12.3@12.925,87.35 14.6,87.35 15.425,86.525 15.425,80.525 17.175,78.775 17.175,74.5 R300.1@19.85,71.825
NetDD12_4: DD12.4 R301.1 | length 17.5
  Top Layer w0.15: DD12.4@12.925,86.08 14.612,86.08 15,85.692 15,80.375 16.45,78.925 16.45,73.725 R301.1@18.35,71.825
NetDD12_5: DD12.5 R302.1 | length 15.4
  Top Layer w0.15: DD12.5@12.925,84.81 14.312,84.81 14.625,84.497 14.625,79.725 15.475,78.875 15.475,73.175 R302.1@16.85,71.8
NetDD12_6: DD12.6 R303.1 | length 13.3
  Top Layer w0.15: DD12.6@12.925,83.54 13.097,83.368 14.012,83.368 14.225,83.155 14.225,72.925 R303.1@15.35,71.8
NetDD12_7: DD12.7 R304.1 | length 12.7
  Top Layer w0.15: DD12.7@12.925,82.27 12.24,82.27 11.175,81.205 11.175,79.55 12.55,78.175 12.55,73.1 R304.1@13.85,71.8
NetDD12_15: DD12.15 R297.1 | length 19.9
  Top Layer w0.15: DD12.15@17.875,88.62 18.56,88.62 18.785,88.395 18.785,88.39 21.125,86.05 21.125,75.05 R297.1@24.35,71.825
NetDD13_1: DD13.1 R306.1 | length 21.9
  Top Layer w0.15: DD13.1@2.575,89.89 3.26,89.89 5.5,87.65 5.5,81.425 10.25,76.675 10.25,72.425 R306.1@10.85,71.825
NetDD13_2: DD13.2 R307.1 | length 20
  Top Layer w0.15: DD13.2@2.575,88.62 3.255,88.62 5.125,86.75 5.125,80.95 7.225,78.85 7.225,75.375 9.35,73.25 R307.1@9.35,71.825
NetDD13_3: DD13.3 R308.1 | length 18.1
  Top Layer w0.15: DD13.3@2.575,87.35 3.3,87.35 4.775,85.875 4.775,80.475 6.325,78.925 6.325,73.35 R308.1@7.85,71.825
NetDD13_4: DD13.4 R309.1 | length 16.3
  Top Layer w0.15: DD13.4@2.575,86.08 3.32,86.08 4.475,84.925 4.475,79.9 5.15,79.225 5.15,73 R309.1@6.35,71.8
NetDD13_5: DD13.5 R310.1 | length 14.4
  Top Layer w0.15: DD13.5@2.575,84.81 2.8,84.585 3.562,84.585 4.15,83.997 4.15,72.5 R310.1@4.85,71.8
NetDD13_6: DD13.6 R311.1 | length 12.8
  Top Layer w0.15: DD13.6@2.575,83.54 3.125,83.54 3.35,83.315 3.85,82.815 3.85,80.55 3.35,80.05 R311.1@3.35,71.825
NetDD13_7: DD13.7 R312.1 | length 12.8
  Top Layer w0.15: R312.1@1.85,71.825 1.7,71.825 1.475,72.05 1.475,72.2 0.975,72.7 0.975,80.959 1.691,81.675 2.962,81.675 3.05,81.763 3.05,82.045 2.825,82.27 DD13.7@2.575,82.27
NetDD13_15: DD13.15 R305.1 | length 19.2
  Top Layer w0.15: DD13.15@7.525,88.62 8.21,88.62 8.435,88.395 8.435,88.365 10.4,86.4 10.4,78.525 11.275,77.65 11.275,72.9 R305.1@12.35,71.825
NetDD14_3: DD14.3 R10.1 VT5.1 X4.5 | length 24
  Bottom Layer w0.15: DD14.3@127.55,45.54 128.385,45.54 129.8,44.125 129.8,33.29 129.325,32.815 129.325,32.695 128.175,31.545 128.175,27.3 129.3,26.175 129.525,25.95 129.525,25.65 128.55,24.675 VT5.1@128.55,24.625
NetDD14_4: DD14.4 R12.1 VT6.1 X4.6 | length 25.3
  Top Layer w0.15: X4.6@129.325,30.155 130.2,29.28 130.2,26.775 129.675,26.25 R12.1@129.525,26.25 129.525,25.6 130.45,24.675 VT6.1@130.45,24.625
  Bottom Layer w0.15: DD14.4@127.55,46.81 127.71,46.65 128.4,46.65 130.4,44.65 130.4,31.23 X4.6@129.325,30.155